# Altium PCB Layout.PcbDoc (part 2 of 2)
Units mm, origin at the board's own origin, x right, y up, seen from the top; angles counter-clockwise.
Board outline 72.5 x 55.5 mm, 4 copper layers (Top Layer, Ground Layer, Power Layer, Bottom Layer), stack 1.591 mm thick; 77 components, 40 nets, 247 pads, 203 vias.
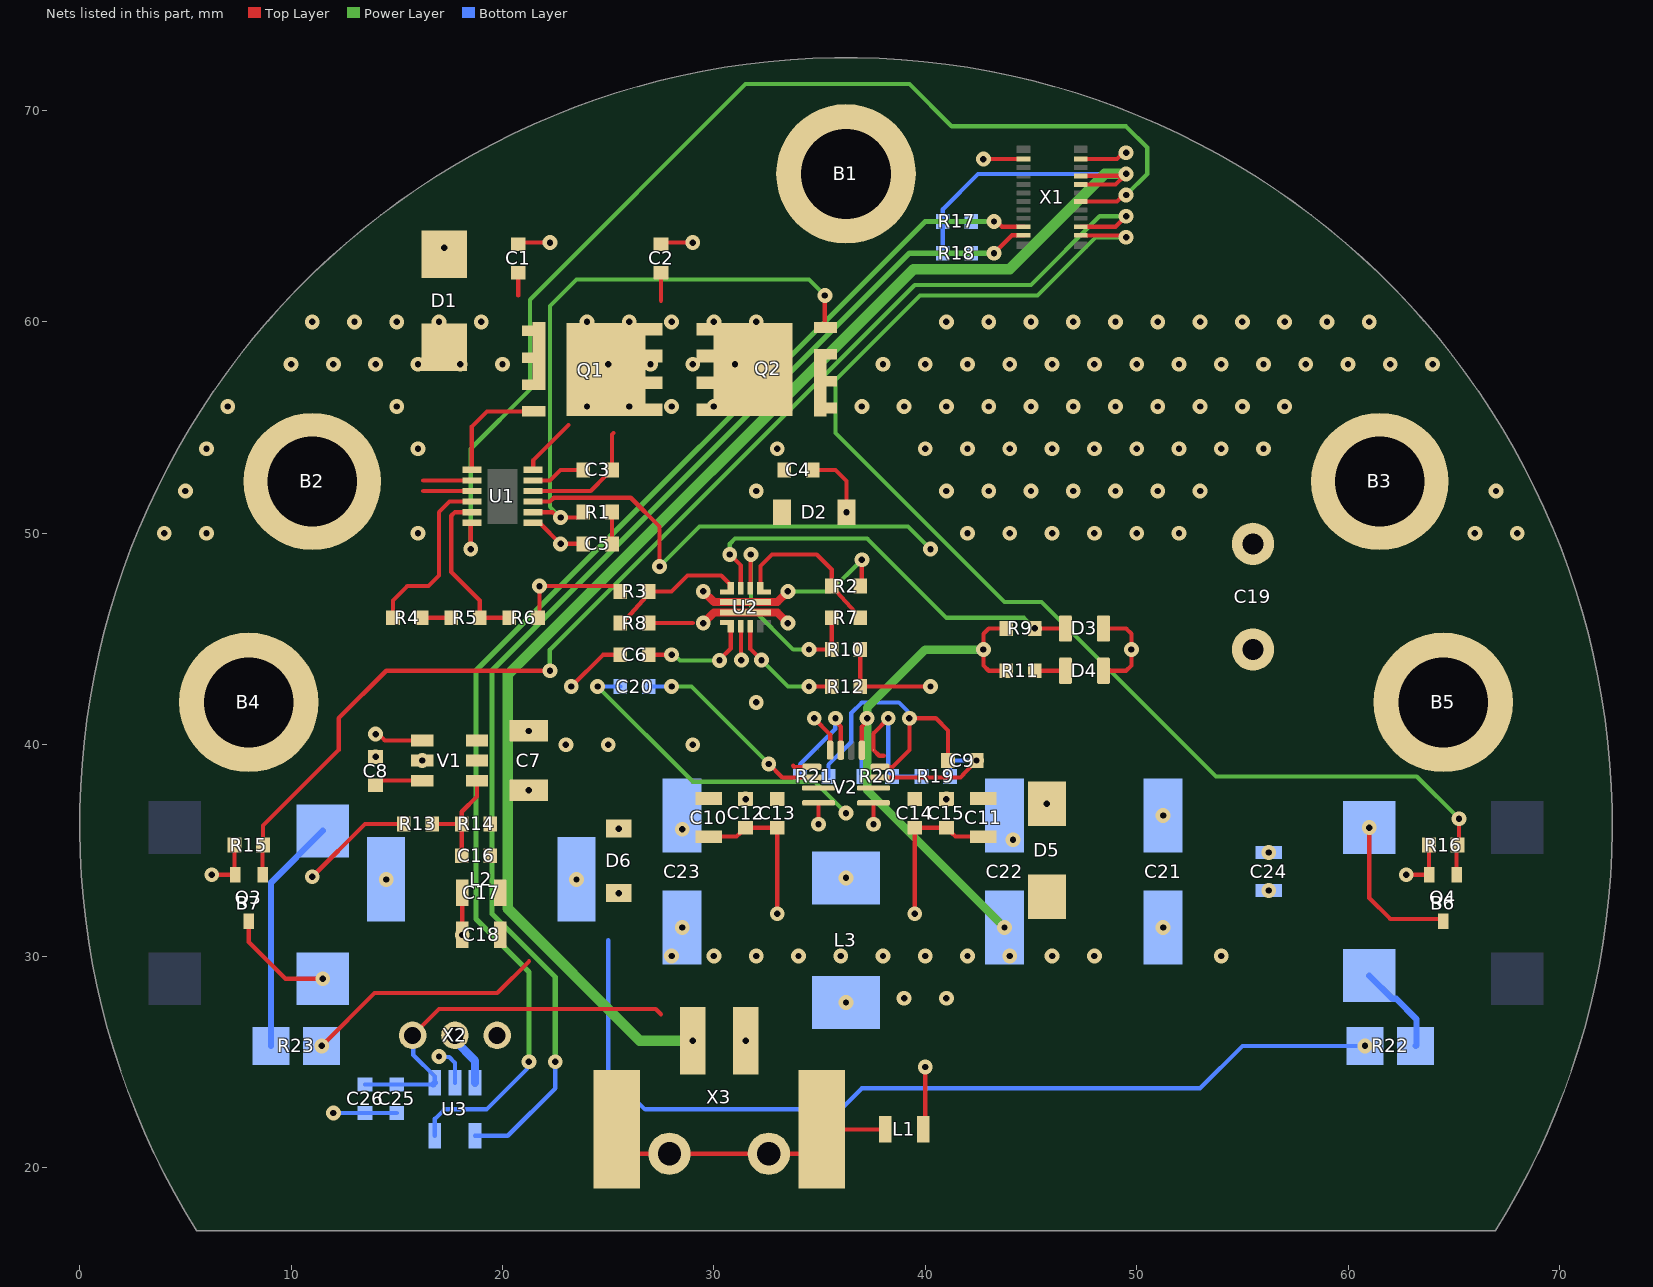
[diagram p4: the nets of this part, all layers, seen from the top]

## Part data
B1 B4 B5: library part "[Bolt] M4 len=4mm OD=6mm Spacer", "ID: 4mm / OD: 6mm", ComponentLink1Description="McMaster Supplier", ComponentLink1URL=https://www.mcmaster.com/94669A006/, System=Connector
B2 B3: library part "[Bolt] M4 16mm Button Head Hex Bolt", "92095A194", ComponentLink1Description="McMaster Link", ComponentLink1URL=https://www.mcmaster.com/92095A194/, System=Connector
B6 B7: library part "[Buzzer] Passive SMD 12V 80mA", "CT08E-16S400-2", Supplier Part Number 1=2603-CT08E-16S400-2CT-ND, Supplier 1=DigiKey
C1 C2 C3 C8 C12 C15 C20 C25: "CL10B104KB8NNNC", Capacitance=100nF, Max Voltage=50V, Size Package=0603, Supplier Part Number 1=1276-1000-6-ND, Tolerance=10%, Supplier 1=DigiKey
C4 C26: "GRM188C81C106MA73D", Capacitance=10uF, Max Voltage=16V, Size Package=0603, Supplier Part Number 1=490-7198-1-ND, Tolerance=20%, Supplier 1=DigiKey
C5: "C0603C103K5RACTU", Capacitance=10nF, Max Voltage=50V, Size Package=0603, Supplier Part Number 1=399-C0603C103K5RACTUDKR-ND, Tolerance=10%, Supplier 1=DigiKey
C6: "C0603C622J5GACTU", Capacitance=6200pF, Max Voltage=50V, Size Package=0603, Supplier Part Number 1=399-9977-6-ND, Tolerance=5%, Supplier 1=DigiKey
C7: "CGA5L3X5R1H106M160AB", Capacitance=10uF, Max Voltage=50V, Size Package=1206, Supplier Part Number 1=445-12883-6-ND, Tolerance=10%, Supplier 1=DigiKey
C9: "GRM188R61E225KA12D", Capacitance=2.2uF, Max Voltage=25V, Size Package=0603, Supplier Part Number 1=490-10731-1-ND, Tolerance=10%, Supplier 1=DigiKey
C10 C11 C17 C18 C24: "CL21A226MAYNNWE", Capacitance=22uF, Max Voltage=25V, Size Package=0805, Supplier Part Number 1=1276-CL21A226MAYNNWECT-ND, Tolerance=20%, Supplier 1=DigiKey
C13 C14: "GRM188R61E475KE11D", Capacitance=4.7uF, Max Voltage=25V, Size Package=0603, Supplier Part Number 1=490-7203-6-ND, Tolerance=10%, Supplier 1=DigiKey
C16: "C0603C120J5GACTU", Capacitance=12pF, Max Voltage=50V, Size Package=0603, Supplier Part Number 1=399-C0603C120J5GACTUCT-ND, Tolerance=5%, Supplier 1=DigiKey
C19: "35PK1000MEFC10X20", Capacitance=1000uF, Max Voltage=35V, Size Package=Thru-Hole, Supplier Part Number 1=1189-1742-ND, Tolerance=20%, Supplier 1=DigiKey
C21 C22 C23: "UWT1V470MCL1GS", Capacitance=47uF, Max Voltage=35V, Size Package=6.3mm, Supplier Part Number 1=493-2202-1-ND, Tolerance=20%, Supplier 1=DigiKey
D1: library part "[TVS] SMBJ33CA", "SMBJ33CA", Optimal Zener Voltage=33V, Supplier Part Number 1=SMBJ33CA-FDICT-ND, Supplier 1=DigiKey, Wattage=600W
D2: library part "[TVS] 17Vnom 27.6Vclamp_max", Optimal Zener Voltage=17V, Supplier Part Number 1=18-SZSMF4L17CAT3GCT-ND, Supplier 1=DigiKey, Wattage=400W
D3: "LG R971-KN-1-0-20-R18", Color=Green, Size Package=0805, Supplier Part Number 1=475-LGR971-KN-1CT-ND, Supplier 1=DigiKey
D4: "LY R976-PS-36-0-20-R18", Color=Yellow, Size Package=0805, Supplier Part Number 1=475-LYR976-PS-36-0-20-R18CT-ND, Supplier 1=DigiKey
D5: library part "[Zener] SMD 5.6V 1W 5%", "SMAZ5V6-13-F", Optimal Zener Voltage=5.6V, Supplier Part Number 1=SMAZ5V6-FDICT-ND, Tolerance=5%, Supplier 1=DigiKey, Wattage=1W
D6: library part "[Zener] SMD 12.75V 1W 5.88%", "KDZVTR12B", Optimal Zener Voltage=12.75V, Supplier Part Number 1=KDZVTR12BCT-ND, Tolerance=5.88%, Supplier 1=DigiKey, Wattage=1W
L1: library part "[Ferrite] SMD 0805 3A 30ohm", Res @ Freq="30 @ 100MHz", Size Package=0805, Supplier Part Number 1=MH2029-300YCT-ND, Supplier 1=DigiKey
L2: "SRU1038-100Y", DC Resistance=25mOhm, Inductance=10uH, Package="10 x 10mm", Supplier Part Number 1=SRU1038-100YCT-ND, Supplier 1=DigiKey
L3: "ECS-MPIL0630-2R2MC", Inductance=2.2uH, Package="7.4 x 6.6mm", Supplier Part Number 1=XC2402CT-ND, Supplier 1=DigiKey
Q1 Q2: "IAUCN04S7N005ATMA1", Supplier Part Number 1=448-IAUCN04S7N005ATMA1CT-ND, Supplier 1=DigiKey
Q3 Q4: "BSS816NWH6327XTSA1", Supplier Part Number 1=BSS816NWH6327XTSA1CT-ND, Supplier 1=DigiKey
R1: "RC0603FR-07100RL", Resistance=100, Size Package=0603, Supplier Part Number 1=311-100HRDKR-ND, Tolerance=1%, Supplier 1=DigiKey, Wattage=1/10W
R2: "CRGCQ0603F470K", Resistance=470k, Size Package=0603, Supplier Part Number 1=A129720DKR-ND, Tolerance=1%, Supplier 1=DigiKey, Wattage=1/10W
R3: "RK73H1JTTD1182F", Resistance=11.8k, Size Package=0603, Supplier Part Number 1=2019-RK73H1JTTD1182FDKR-ND, Tolerance=1%, Supplier 1=DigiKey, Wattage=1/10W
R4: "CR0603-FX-9092ELF", Resistance=90.9k, Size Package=0603, Supplier Part Number 1=CR0603-FX-9092ELFCT-ND, Tolerance=1%, Supplier 1=DigiKey, Wattage=1/10W
R5: "RMCF0603FT9K09", Resistance=9.09k, Size Package=0603, Supplier Part Number 1=RMCF0603FT9K09CT-ND, Tolerance=1%, Supplier 1=DigiKey, Wattage=1/10W
R6: "RMCF0603FT3K48", Resistance=3.48k, Size Package=0603, Supplier Part Number 1=RMCF0603FT3K48CT-ND, Tolerance=1%, Supplier 1=DigiKey, Wattage=1/10W
R7: "MCT06030C8201FP500", Resistance=8.2k, Size Package=0603, Supplier Part Number 1=MCT0603-8.20K-CFDKR-ND, Tolerance=1%, Supplier 1=DigiKey, Wattage=1/10W
R8 R9: "RC0603FR-07100KL", Resistance=100k, Size Package=0603, Supplier Part Number 1=311-100KHRDKR-ND, Tolerance=1%, Supplier 1=DigiKey, Wattage=1/10W
R10: "RMCF0603FT34K8", Resistance=34.8k, Size Package=0603, Supplier Part Number 1=RMCF0603FT34K8DKR-ND, Tolerance=1%, Supplier 1=DigiKey, Wattage=1/10W
R11: "RK73B1JTTD221J", Resistance=220, Size Package=0603, Supplier Part Number 1=2019-RK73B1JTTD221JDKR-ND, Tolerance=5%, Supplier 1=DigiKey, Wattage=1/8W
R12: "ERJ-3EKF5620V", Resistance=562, Size Package=0603, Supplier Part Number 1=P562HDKR-ND, Tolerance=1%, Supplier 1=DigiKey, Wattage=1/10W
R13: "RC0603FR-0730K1L", Resistance=30.1k, Size Package=0603, Supplier Part Number 1=311-30.1KHRCT-ND, Tolerance=1%, Supplier 1=DigiKey, Wattage=1/10W
R14: "ERJ-3EKF4223V", Resistance=422k, Size Package=0603, Supplier Part Number 1=P422KHDKR-ND, Tolerance=1%, Supplier 1=DigiKey, Wattage=1/10W
R15 R16: "RC0603FR-071ML", Resistance=1M, Size Package=0603, Supplier Part Number 1=311-1.00MHRDKR-ND, Tolerance=1%, Supplier 1=DigiKey, Wattage=1/10W
R17 R18 R21: "RMCF0603FT1K00", Resistance=1k, Size Package=0603, Supplier Part Number 1=RMCF0603FT1K00DKR-ND, Tolerance=1%, Supplier 1=DigiKey, Wattage=1/10W
R19: "RMCF0603FT10K0", Resistance=10k, Size Package=0603, Supplier Part Number 1=RMCF0603FT10K0DKR-ND, Tolerance=1%, Supplier 1=DigiKey, Wattage=1/10W
R20: "RC0603FR-0752K3L", Resistance=52.3k, Size Package=0603, Supplier Part Number 1=311-52.3KHRCT-ND, Tolerance=1%, Supplier 1=DigiKey, Wattage=1/10W
R22 R23: "HRG3216P-1000-D-T1", Resistance=100, Size Package=1206, Supplier Part Number 1=408-1865-1-ND, Tolerance=0.5%, Supplier 1=DigiKey, Wattage=1W
U1: "LM74810QDRRRQ1", Supplier Part Number 1=296-LM74810QDRRRQ1CT-ND, Supplier 1=DigiKey
U2: library part "[E-Fuse] 2.7-23V 5.5A", Supplier Part Number 1=296-TPS259460ARPWRDKR-ND, Supplier 1=DigiKey
U3: "MCP3221A0T-E/OT", Supplier Part Number 1=MCP3221A0T-E/OTCT-ND, Supplier 1=DigiKey
V1: library part "[Switching] SMD 0.8-31V 3A", "AP63301WU-7", Supplier Part Number 1=31-AP63301WU-7CT-ND, Supplier 1=DigiKey
V2: "MAX20408AFOF/VY+", Supplier Part Number 1=505-MAX20408AFOF/VY+-ND, Supplier 1=DigiKey
X1: "DF40C-20DP-0.4V(51)", Supplier Part Number 1=H11618CT-ND, Supplier 1=DigiKey, System=Connector
X2: "0353630360", Supplier Part Number 1=WM18932-ND, Supplier 1=DigiKey
X3: "1778764", Supplier Part Number 1=277-2315-1-ND, Supplier 1=DigiKey, System=Connector

## Via types
v1: diameter 0.7, hole 0.3, Top Layer to Bottom Layer, 203 vias

## Nets (pads, with @x,y where several pads share a name; then routed paths per layer and width w, separated by ;. In a path a pad name is that pad's centre, name@x,y a point inside that pad or via, vN(x,y) a via of type N, cw(c..) or ccw(c..) an arc to the next point about the centre after c; other vN are vias at no path point)
+5V: C21.1 C22.1 C23.1 C24.2 C25.2 C26.2 D5.1 L3.2 R9.2 R11.1 R17.2 R18.2 R20.2 U3.1 V2.13 X1.5 X1.7 X2.1 X3.1 | length 123.7
  Top Layer w0.2: X2.1@15.75,26.25 17,27.5 27.25,27.5 27.5,27.25 ; V2.13@37,39.736 37,40.852 37.25,41.102 v1@37.25,41.237 ; R11.1@43.825,43.5 43,43.5 42.75,43.75 v1(42.75,44.5) 42.75,45.25 43,45.5 R9.2@43.825,45.5 ; X1.7@47.355,66.5 49,66.5 49.415,66.915 47.37,66.915 X1.5@47.355,66.9
  Power Layer w0.4: v1(42.75,44.5) 40,44.5 37.255,41.755 37.255,41.255 v1(37.25,41.25) 37.25,37.85 v1(43.75,31.35)
  Power Layer w0.5: v1(29,26) 26.5,26 20.25,32.25 20.25,43.3 39.45,62.5 44,62.5 48.5,67 v1(49.5,67)
  Bottom Layer w0.2: C26.2@13.5,23.925 C25.2@15,23.925 U3.1@16.725,23.925 ; X2.1@15.75,26.25 15.78,26.22 15.78,25.32 16.8,24.3 U3.1@16.8,24 ; R20.2@37.075,38.5 37,38.575 37,39.75 37.25,40 v1(37.25,41.25) ; R18.2@40.825,63.25 R17.2@40.825,64.75 40.825,65.325 42.5,67 v1(49.5,67)
  Bottom Layer w0.3: U3.1@16.725,23.925 U3.1@16.8,24
  other v1: 36.25,27.8 39,28 41,28 28,30 30,30 32,30 34,30 36,30 38,30 40,30 42,30 44,30 46,30 48,30 54,30 28.5,31.35 51.25,31.35 56.25,33.1
"+5V Reg BIAS": C9.2 R21.1 V2.11 | length 13.6
  Top Layer w0.2: V2.11@37.862,38.95 38.45,38.95 39.25,39.75 v1(39.25,41.25) 40.5,41.25 41.075,40.675 C9.2@41.075,39.25
  Bottom Layer w0.2: R21.1@35.425,38.5 35.425,39.055 36.5,40.13 36.5,41.5 37,42 38.75,42 39.154,41.596 39.154,41.346 v1(39.25,41.25)
"+5V Reg FB": R19.2 R20.1 V2.12 | length 6.6
  Top Layer w0.2: V2.12@38.037,39.475 37.825,39.475 V2.12@37.55,39.75 37.55,40.537 v1@38.25,41.237
  Bottom Layer w0.2: v1(38.25,41.25) 38.25,38.675 R20.1@38.425,38.5 R19.2@39.825,38.5
"+5V Reg PGOOD": R21.2 V2.15 | length 5
  Top Layer w0.2: v1@35.75,41.237 35.75,41.102 36,40.852 V2.15@36,39.737
  Bottom Layer w0.2: R21.2@34.075,38.5 34.075,39.075 35.745,40.745 35.745,41.245 v1(35.75,41.25)
+12V: C16.2 C17.2 C18.2 D6.1 L2.2 R14.2 R22.2 R23.2 | length 55.5
  Top Layer w0.2: v1(11.45,25.75) 13.95,28.25 19.75,28.25 21.25,29.75
  Bottom Layer w0.2: 25,30.75 25,24.5 26.75,22.75 36,22.75 37,23.75 53,23.75 55,25.75 v1(60.8,25.75)
  other v1: 25.5,32.975 23.5,33.625
"+12V Reg BST": C8.2 V1.6 | length 2.3
  Top Layer w0.2: C8.2@14,38.075 14.225,38.3 V1.6@16.2,38.3
"+12V Reg FB": C16.1 R13.2 R14.1 V1.1 | length 5.3
  Top Layer w0.2: R13.2@16.675,36.25 R14.1@18.075,36.25 ; C16.1@18.075,34.75 R14.1@18.075,36.25 ; V1.1@18.8,38.3 18.8,37.55 18.075,36.825 R14.1@18.075,36.25
"+12V Reg SW": C8.1 L2.1 V1.5
  other v1: 14.5,33.625 16.2,39.25 14,39.425
"BATT Switched": B3.1 C19.1 Q2.1 U1.9 | length 22.6
  Top Layer w0.2: U1.9@21.45,51.5 22.25,51.5 22.43,51.68 26.07,51.68 27.432,50.318 v1(27.432,48.432)
  Power Layer w0.2: v1(27.432,48.432) 29.32,50.32 39.18,50.32 v1(40.25,49.25)
  other v1: 42,50 44,50 46,50 48,50 50,50 52,50 66,50 68,50 41,52 43,52 45,52 47,52 49,52 51,52 53,52 67,52 40,54 42,54 44,54 46,54 48,54 50,54 52,54 54,54 56,54 37,56 39,56 41,56 43,56 45,56 47,56 49,56 51,56 53,56 55,56 57,56 38,58 40,58 42,58 44,58 46,58 48,58 50,58 52,58 54,58 56,58 58,58 60,58 62,58 64,58 41,60 43,60 45,60 47,60 49,60 51,60 53,60 55,60 57,60 59,60 61,60
BATT_always_on: C2.2 C3.2 C4.2 D2.1 Q1.3 Q2.3 R2.2 U1.10 U1.12 U2.5 | length 19.9
  Top Layer w0.2: U1.10@21.45,52 24.175,52 24.925,52.75 24.95,52.75 25.175,52.975 C3.2@25.175,53 25.175,54.675 25.25,54.75 ; U1.12@21.45,53 21.45,53.45 23.125,55.125 ; 27.5,61 C2.2@27.5,62.325 ; R2.2@36.925,47.5 37,47.575 v1(37,48.75)
  Top Layer w0.38: v1(29.5,47.25) 30,46.75 U2.5@31.5,46.75 33,46.75 v1(33.5,47.25)
  Power Layer w0.2: v1(33.5,47.25) 35.5,47.25 v1(37,48.75)
  other v1: 32,52 33,54 24,56 26,56 28,56 30,56 25,58 27,58 29,58 31,58 24,60 26,60 28,60 30,60 32,60
BATT_MON: R4.1 R5.2 | length 1.4
  Top Layer w0.2: R4.1@16.175,46 R5.2@17.575,46
"BATTERY IN": B2.1 C1.2 D1.2 Q1.1 U1.2 U1.3 | length 5.7
  Top Layer w0.2: 16.25,52 U1.3@18.55,52 ; 16.25,52.5 U1.2@18.55,52.5 ; 20.75,61.25 C1.2@20.75,62.325
  other v1: 4,50 6,50 16,50 5,52 6,54 16,54 7,56 15,56 10,58 12,58 14,58 16,58 18,58 20,58 11,60 13,60 15,60 17,60 19,60
Buzzer_Ctrl_1: Q4.1 R16.2 X1.19 | length 60.9
  Top Layer w0.2: X1.19@47.355,64.1 47.37,64.085 49.415,64.085 v1(49.5,64) ; Q4.1@65.125,33.875 R16.2@65.125,35.25 ; R16.2@65.175,35.25 65.25,35.325 v1(65.25,36.5)
  Power Layer w0.2: v1(49.5,64) 48.057,64 45.307,61.25 39.75,61.25 35.75,57.25 35.75,54.75 43.75,46.75 45.5,46.75 53.75,38.5 63.25,38.5 v1(65.25,36.5)
Buzzer_Ctrl_2: Q3.1 R15.2 X1.17 | length 58.9
  Top Layer w0.2: Q3.1@8.65,33.85 8.65,35.225 R15.2@8.675,35.25 8.675,36.175 12.25,39.75 12.25,41.25 14.5,43.5 v1(22.25,43.5) ; X1.17@47.355,64.5 49,64.5 v1(49.5,65)
  Power Layer w0.2: v1(22.25,43.5) 22.241,43.509 22.241,44.491 39.5,61.75 45,61.75 48.25,65 v1(49.5,65)
CAP: C3.1 U1.11 | length 2.6
  Top Layer w0.2: U1.11@21.45,52.5 22.25,52.5 22.75,53 C3.1@23.825,53
Current_Sense_5V: U3.3 X2.2 | length 2.6
  Bottom Layer w0.4: X2.2@17.75,26.25 17.75,26 18.7,25.05 U3.3@18.7,24
DGATE: Q1.2 U1.1 | length 5.3
  Top Layer w0.2: U1.1@18.55,53 18.55,55.05 19.265,55.765 Q1.2@21.475,55.765
Earth: L1.1 X3.MP | length 14
  Top Layer w0.2: X3.MP@25.4,21.8 25.4,21.65 26.4,20.65 X3.MP@27.9,20.65 X3.MP@32.6,20.65 34.1,20.65 35.1,21.65 X3.MP@35.1,21.8 37.9,21.8 38.1,21.6 L1.1@38.1,21.5
EFuse_PGOOD: D3.1 R9.1 U2.3 | length 20.1
  Top Layer w0.2: v1(30.75,49) 31.275,48.475 U2.3@31.275,47.4 ; v1(45.175,45.5) 45.178,45.497 D3.1@46.63,45.497
  Power Layer w0.2: v1(30.75,49) 30.755,49.005 30.755,49.505 31,49.75 37.25,49.75 41,46 44.675,46 v1(45.175,45.5)
GND: B1.1 B4.1 B5.1 C1.1 C2.1 C4.1 C5.1 C6.1 C7.1 C9.1 C10.1 C11.1 C12.1 C13.1 C14.1 C15.1 C17.1 C18.1 C19.2 C21.2 C22.2 C23.2 C24.1 C25.1 C26.1 D1.1 D2.2 D3.2 D4.2 D5.2 D6.2 L1.2 Q3.2 Q4.2 R3.1 R6.2 R10.1 R12.1 R13.1 R15.1 R16.1 R19.1 U1.7 U2.8 U3.2 V1.4 V2.4 V2.5 V2.7 V2.8 V2.10 V2.16 X1.1 X1.2 X2.3 X3.2 | length 80.8
  Top Layer w0.2: v1(6.25,33.85) Q3.2@7.35,33.85 ; Q3.2@7.325,33.875 R15.1@7.325,35.25 R15.1@7.35,35.225 ; v1(11,33.75) 13.5,36.25 R13.1@15.325,36.25 ; v1(14,40.5) 14.135,40.5 14.435,40.2 V1.4@16.2,40.2 ; v1(18.1,31) C17.1@18.1,33 ; C1.1@20.75,63.675 20.825,63.75 v1(22.25,63.75) ; U1.7@21.45,50.5 21.75,50.5 v1(22.75,49.5) C5.1@23.825,49.5 ; R6.2@21.675,46 21.75,46.075 v1(21.75,47.5) 25.35,47.5 25.575,47.275 R3.1@25.575,47.25 ; v1(23.25,42.75) 24.75,44.25 C6.1@25.575,44.25 ; C2.1@27.5,63.675 27.575,63.75 v1(29,63.75) ; C10.1@29.75,35.65 31.075,35.65 31.25,35.825 31.25,35.85 31.475,36.075 C12.1@31.5,36.075 32.875,36.075 33,35.95 v1(33,32) ; v1@31.287,44.012 U2.8@31.287,45.587 ; C4.1@34.675,53 35.75,53 36.275,52.475 v1(36.275,51) ; v1@34.75,41.237 35.5,40.487 V2.16@35.5,39.737 ; v1(34.95,36.237) V2.4@34.951,37.25 ; R10.1@36.925,44.5 R12.1@36.925,42.75 v1(40.25,42.75) ; v1(37.55,36.237) V2.8@37.55,37.25 ; V2.10@37.862,38.45 41.663,38.45 41.838,38.625 41.838,38.638 42.425,39.225 v1(42.425,39.25) ; v1(39.5,32) 39.5,35.95 39.625,36.075 C15.1@41,36.075 41.025,36.075 41.25,35.85 41.25,35.825 41.425,35.65 C11.1@42.75,35.65 ; L1.2@39.9,21.8 40,21.9 v1(40,24.75) ; v1(42.75,67.7) X1.2@44.645,67.7 ; X1.1@47.355,67.7 49.065,67.7 49.365,68 v1(49.5,68) ; D4.2@48.43,43.497 49.497,43.497 49.75,43.75 v1(49.75,44.5) 49.75,45.25 49.503,45.497 D3.2@48.43,45.497 ; v1(62.75,33.85) Q4.2@63.85,33.85 ; Q4.2@63.825,33.875 R16.1@63.825,35.25
  Bottom Layer w0.2: v1(12,22.575) C26.1@13.5,22.575 C25.1@15,22.575 ; v1(17,25.25) 17.03,25.22 17.48,25.22 17.75,24.95 U3.2@17.75,24 ; R19.1@41.175,38.5 41.175,39.139 41.286,39.25 v1(42.425,39.25)
  other v1: 31.5,26 56.25,34.9 44.15,35.5 28.5,36 25.5,36.025 51.25,36.65 45.75,37.2 21.25,37.85 34.75,41.25 31.3,44 17.25,63.5
HGATE: Q2.2 R1.1 U1.8 | length 28.2
  Top Layer w0.2: U1.8@21.45,51 22.365,51 22.615,50.75 23.6,50.75 23.825,50.975 R1.1@23.825,51 ; v1(35.25,61.25) 35.25,59.76 Q2.2@35.275,59.735
  Power Layer w0.2: v1(22.75,50.75) 22.25,51.25 22.25,60.75 23.5,62 34.5,62 v1(35.25,61.25)
NetB6_1: B6.1 R22.1 | length 4.4
  Bottom Layer w0.3: B6.1@61,29.076 62.1,27.976 62.274,27.976 63.236,27.014 63.236,25.786 R22.1@63.2,25.75
NetB6_2: B6.2 Q4.3 | length 7.3
  Top Layer w0.2: v1(61,36.076) 61,32.75 62,31.75 64.4,31.75 Q4.3@64.5,31.65
NetB7_1: B7.1 R23.1 | length 11.2
  Bottom Layer w0.3: R23.1@9.05,25.75 9.05,33.474 B7.1@11.5,35.924
NetB7_2: B7.2 Q3.3 | length 5.2
  Top Layer w0.2: Q3.3@8,31.65 8,30.662 9.738,28.924 v1(11.5,28.924)
NetC5_2: C5.2 R1.2 | length 1.5
  Top Layer w0.2: C5.2@25.175,49.5 R1.2@25.175,51
NetC6_2: C6.2 U2.7 | length 5.4
  Top Layer w0.1: U2.7@30.475,45.775 U2.7@30.725,45.775
  Top Layer w0.2: C6.2@27.025,44.25 v1(28,44.25) ; v1@30.25,44 30.8,44.55 U2.7@30.8,45.6
  Power Layer w0.2: v1(28,44.25) 28.135,44.25 28.398,43.987 v1(30.262,43.987)
NetC20_1: C20.1 V2.2 | length 9.5
  Top Layer w0.2: v1(32.6,39.086) 33.236,38.45 V2.2@34.638,38.45
  Power Layer w0.2: v1(28,42.75) 28.936,42.75 v1(32.6,39.086)
  Bottom Layer w0.2: C20.1@26.925,42.75 v1(28,42.75)
NetC20_2: C20.2 L3.1 V2.6 | length 15.3
  Power Layer w0.2: v1(24.5,42.75) 29,38.25 34.763,38.25 v1(36.25,36.762)
  Bottom Layer w0.2: v1(24.5,42.75) C20.2@25.575,42.75
  other v1: 36.25,33.7
NetD4_1: D4.1 R11.2 | length 1.5
  Top Layer w0.2: R11.2@45.175,43.5 45.178,43.497 D4.1@46.63,43.497
NetR2_1: R2.1 R7.2 U2.1 | length 8
  Top Layer w0.1: U2.1@32.275,47.225 U2.1@32.525,47.225
  Top Layer w0.2: U2.1@32.2,47.4 32.2,48.45 32.75,49 34.865,49 35.575,48.29 R2.1@35.575,47.5 35.8,47.25 36.7,46.25 R7.2@36.925,46
NetR3_2: R3.2 R8.1 U2.4 | length 6.4
  Top Layer w0.1: U2.4@30.475,47.225 U2.4@30.725,47.225
  Top Layer w0.2: 25.9,46 26.8,47 27.025,47.25 28,47.25 28.75,48 30.35,48 30.75,47.6 30.75,47.45 U2.4@30.8,47.4
NetR7_1: R7.1 R10.2 U2.2 | length 10.3
  Top Layer w0.2: U2.2@31.725,47.4 31.738,47.412 31.738,48.988 v1(31.75,49) ; v1(34.5,44.5) R10.2@35.575,44.5 R7.1@35.575,46
  Power Layer w0.2: v1(31.75,49) 31.75,46.5 33.75,44.5 v1(34.5,44.5)
NetR12_2: R12.2 U2.9 | length 5.7
  Top Layer w0.2: U2.9@31.725,45.6 31.725,44.525 v1(32.25,44) ; v1(34.5,42.75) R12.2@35.575,42.75
  Power Layer w0.2: v1(32.25,44) 33.5,42.75 v1(34.5,42.75)
ORing_EN: U1.6 X1.11 | length 53.8
  Top Layer w0.2: v1(18.5,49.25) 18.5,50.45 U1.6@18.55,50.5 ; X1.11@47.355,65.7 49.065,65.7 49.365,66 v1(49.5,66)
  Power Layer w0.2: v1(18.5,49.25) 18.5,54 21.3,56.8 21.3,61.05 31.5,71.25 39.25,71.25 41.25,69.25 49.5,69.25 50.5,68.25 50.5,67 v1(49.5,66)
OV: R5.1 R6.1 U1.5 | length 7.8
  Top Layer w0.2: U1.5@18.55,51 17.75,51 17.579,50.829 17.579,48.171 18.925,46.825 R5.1@18.925,46 R6.1@20.325,46
SCL_5V: R17.1 U3.5 X1.18 | length 61.9
  Top Layer w0.2: v1(43.25,64.75) 43.385,64.75 43.635,64.5 X1.18@44.645,64.5
  Power Layer w0.25: v1(21.25,25) 21.25,29.25 18.75,31.75 18.75,43.5 40,64.75 v1(43.25,64.75)
  Bottom Layer w0.2: U3.5@16.8,21.5 16.8,22.3 17.25,22.75 19.25,22.75 21.154,24.654 21.154,24.904 v1(21.25,25) ; R17.1@42.175,64.75 v1(43.25,64.75)
SDA_5V: R18.1 U3.4 X1.20 | length 60.5
  Top Layer w0.2: v1(43.25,63.25) 44.1,64.1 X1.20@44.645,64.1
  Power Layer w0.25: v1(22.5,25) 22.5,29 19.5,32 19.5,43.5 39.25,63.25 v1(43.25,63.25)
  Bottom Layer w0.2: U3.4@18.7,21.5 20.25,21.5 22.5,23.75 v1(22.5,25) ; R18.1@42.175,63.25 v1(43.25,63.25)
SW: R4.2 U1.4 | length 8.2
  Top Layer w0.2: R4.2@14.825,46 14.825,46.825 15.5,47.5 16.5,47.5 17,48 17,51 17.5,51.5 U1.4@18.55,51.5
VREG_IN: C7.2 C10.2 C11.2 C12.2 C13.2 C14.2 C15.2 R8.2 U2.6 V1.2 V1.3 V2.1 V2.3 V2.9 | length 7.3
  Top Layer w0.2: R8.2@27.025,45.75 29,45.75 ; 33.75,39 33.8,38.95 V2.1@34.638,38.95
  Top Layer w0.38: v1(29.5,45.75) 30,46.25 U2.6@31.5,46.25 33,46.25 v1(33.5,45.75)
  other v1: 31.5,37.425 41,37.425 23,40 25,40 29,40 21.25,40.65 32,42
pads on no net: B6.MP B7.MP U1.13 U2.10 V2.14 V2.17 X1.3 X1.4 X1.6 X1.8 X1.9 X1.10 X1.12 X1.13 X1.14 X1.15 X1.16 X1.MP

## Polygon pours and split planes (outlines as drawn)
GND on Bottom Layer "GND Bottom Poly" (hatched 45Degree grid 0.6 track 0.2, remove dead copper, pour order 312): 0,17 0,72.5 72.5,72.5 72.5,17
VREG_IN on Bottom Layer "VREG_IN Bottom Poly" (solid, remove dead copper, pour order 299): 28.75,46.25 34,46.25 34,39.25 ccw(c35,39.25) 35,38.25 43.75,38.25 43.75,36.75 39.25,36.75 38.5,37.5 34,37.5 33.25,36.75 28,36.75 26,38.75 18,38.75 18,41.75 27.75,41.75 ccw(c27.75,42.75) 28.75,42.75
BATT_always_on on Bottom Layer "Batt Always On Bottom Poly" (solid, remove dead copper, pour order 303): 23.75,61.5 33,61.5 cw(c33,60.5) 34,60.5 34,46.75 28.75,46.75 28.75,53.5 ccw(c27.75,53.5) 27.75,54.5 23.75,54.5 cw(c23.75,55.5) 22.75,55.5 22.75,60.5 cw(c23.75,60.5)
"BATT Switched" on Bottom Layer "Batt Switched Bottom Poly" (solid, remove dead copper, pour order 306): 34.5,59.25 38.5,59.25 ccw(c38.5,60.25) 39.5,60.25 39.5,60.75 cw(c40.5,60.75) 40.5,61.75 70.75,61.75 70.75,48 41,48 cw(c41,49.5) 39.5,49.5 39.5,53 ccw(c38,53) 38,54.5 34.5,54.5
"+12V Reg SW" on Bottom Layer "+12V SW Bottom Poly" (solid, remove dead copper, pour order 301): 12.75,31.5 16.25,31.5 ccw(c16.25,32) 16.75,32 16.75,39.5 ccw(c16.25,39.5) 16.25,40 12.75,40 ccw(c12.75,39.5) 12.25,39.5 12.25,32 ccw(c12.75,32)
+12V on Bottom Layer "+12V Bottom Poly" (solid, remove dead copper, pour order 302): 19.5,37.25 23.75,37.25 cw(c23.75,36.75) 24.25,36.75 24.25,35.25 ccw(c24.75,35.25) 24.75,34.75 26,34.75 cw(c26.025,34.275) 26.5,34.3 26.5,30 cw(c26,30) 26,29.5 19.5,29.5 cw(c19.5,30) 19,30 19,36.75 cw(c19.5,36.75)
+5V on Bottom Layer "+5V " (solid, remove dead copper, pour order 304): 57.25,34 42.75,34 ccw(c42.75,33) 41.75,33 41.75,32 cw(c40.75,32) 40.75,31 31,31 cw(c31,32) 30,32 30,33 ccw(c29.5,33) 29.5,33.5 27.5,33.5 ccw(c27.5,33) 27,33 27,24.25 ccw(c27.5,24.25) 27.5,23.75 29.5,23.75 ccw(c29.5,24.25) 30,24.25 30,27.25 cw(c31,27.25) 31,28.25 32,28.25 cw(c32,27.25) 33,27.25 33,26.75 ccw(c34,26.75) 34,25.75 45,25.75 ccw(c45,26.75) 46,26.75 46,28.25 cw(c47,28.25) 47,29.25 57.25,29.25 ccw(c57.25,29.75) 57.75,29.75 57.75,33.5 ccw(c57.25,33.5)
"BATTERY IN" on Bottom Layer "Batt In Bottom Poly" (solid, remove dead copper, pour order 305): 22.25,61.5 22.25,56.5 16.5,56.5 16.5,49.5 cw(c14.945,49.555) 14.889,48 0.5,48 0.5,61.5
NetC20_2 on Bottom Layer "+5V Inductor Bottom Poly" (solid, remove dead copper, pour order 300): 37,35.25 38.25,35.25 38.25,32.25 34.25,32.25 34.25,35.25 35.5,35.25 35.95,35.8 35.95,37.725 36.55,37.725 36.55,35.8
GND on Top Layer "GND Top Poly" (hatched 45Degree grid 0.6 track 0.2, remove dead copper, pour order 313): 0,17 0,72.5 72.5,72.5 72.5,17
BATT_always_on on Top Layer "Batt Always On Top Poly" (solid, remove dead copper, pour order 293): 23.75,61.5 33,61.5 cw(c33,60.5) 34,60.5 34,46.75 28.75,46.75 28.75,53.5 ccw(c27.75,53.5) 27.75,54.5 23.75,54.5 cw(c23.75,55.5) 22.75,55.5 22.75,60.5 cw(c23.75,60.5)
VREG_IN on Top Layer "VREG_IN Top Poly" (solid, remove dead copper, pour order 290): 28.75,46.25 34,46.25 34,39.25 ccw(c35,39.25) 35,38.25 43.75,38.25 43.75,36.75 39.25,36.75 38.5,37.5 34,37.5 33.25,36.75 28,36.75 26,38.75 18,38.75 18,41.75 27.75,41.75 ccw(c27.75,42.75) 28.75,42.75
+12V on Top Layer "+12V Top Poly" (solid, remove dead copper, pour order 292): 19.5,37.25 23.75,37.25 cw(c23.75,36.75) 24.25,36.75 24.25,35.25 ccw(c24.75,35.25) 24.75,34.75 26,34.75 cw(c26.025,34.275) 26.5,34.3 26.5,30 cw(c26,30) 26,29.5 19.5,29.5 cw(c19.5,30) 19,30 19,36.75 cw(c19.5,36.75)
+5V on Top Layer "+5V Top Poly" (solid, remove dead copper, pour order 294): 57.25,34 42.75,34 ccw(c42.75,33) 41.75,33 41.75,32 cw(c40.75,32) 40.75,31 31,31 cw(c31,32) 30,32 30,33 ccw(c29.5,33) 29.5,33.5 27.5,33.5 ccw(c27.5,33) 27,33 27,24.25 ccw(c27.5,24.25) 27.5,23.75 29.5,23.75 ccw(c29.5,24.25) 30,24.25 30,27.25 cw(c31,27.25) 31,28.25 32,28.25 cw(c32,27.25) 33,27.25 33,26.75 ccw(c34,26.75) 34,25.75 45,25.75 ccw(c45,26.75) 46,26.75 46,28.25 cw(c47,28.25) 47,29.25 57.25,29.25 ccw(c57.25,29.75) 57.75,29.75 57.75,33.5 ccw(c57.25,33.5)
"BATTERY IN" on Top Layer "Batt In Top Poly" (solid, remove dead copper, pour order 295): 22.25,61.5 22.25,56.5 18,56.5 ccw(c18,55) 16.5,55 16.5,49.5 cw(c15,49.5) 15,48 0.5,48 0.5,61.5
"BATT Switched" on Top Layer "Batt Switched TopPoly" (solid, remove dead copper, pour order 296): 34.5,59.25 38.5,59.25 ccw(c38.5,60.25) 39.5,60.25 39.5,60.75 cw(c40.5,60.75) 40.5,61.75 70.75,61.75 70.75,48 41,48 cw(c41,49.5) 39.5,49.5 39.5,53 ccw(c38,53) 38,54.5 34.5,54.5
NetC20_2 on Top Layer "+5V Inductor Top Poly" (solid, remove dead copper, pour order 291): 37,35.25 38.25,35.25 38.25,32.25 34.25,32.25 34.25,35.25 35.5,35.25 35.95,35.8 35.95,37.725 36.55,37.725 36.55,35.8
"+12V Reg SW" on Power Layer "+12V SW Power Poly" (solid, remove dead copper, pour order 298): 12.75,31.5 16.25,31.5 ccw(c16.25,32) 16.75,32 16.75,39.5 ccw(c16.25,39.5) 16.25,40 12.75,40 ccw(c12.75,39.5) 12.25,39.5 12.25,32 ccw(c12.75,32)
GND on Ground Layer "GND Power Poly" (solid, remove dead copper, pour order 297): 0,17 0,72.5 72.5,72.5 72.5,17
BATT_always_on on Bottom Solder "Batt Always On Bottom Solder Poly" (solid, pour order 311): 23.75,61.5 33,61.5 cw(c33,60.5) 34,60.5 34,46.75 28.75,46.75 28.75,53.5 ccw(c27.75,53.5) 27.75,54.5 23.75,54.5 cw(c23.75,55.5) 22.75,55.5 22.75,60.5 cw(c23.75,60.5)
"BATTERY IN" on Bottom Solder "Batt In Bottom Solder Poly" (solid, pour order 309): 22.25,61.5 22.25,56.5 16.5,56.5 16.5,49.5 cw(c15,49.5) 15,48 0.5,48 0.5,61.5
"BATT Switched" on Bottom Solder "Batt Switched Bottom Solder Poly" (solid, pour order 310): 34.5,59.25 38.5,59.25 ccw(c38.5,60.25) 39.5,60.25 39.5,60.75 cw(c40.5,60.75) 40.5,61.75 70.75,61.75 70.75,48 41,48 cw(c41,49.5) 39.5,49.5 39.5,53 ccw(c38,53) 38,54.5 34.5,54.5

## Keep-outs
Keep-Out Layer:
  the board outline again, w0.2

## Silkscreen, mask and mechanical layers (free items; w line width, h text height)
Top Overlay:
  region: 63.749,23.466 63.057,23.466 63.057,22.761 60.943,22.761 60.943,23.466 60.238,23.466 60.238,22.057 60.943,22.057 60.943,20.647 60.238,20.647 60.238,22.057 58.829,22.057 58.829,21.353 58.83,21.353 58.83,21.352 59.534,21.352 59.534,20.647 58.83,20.647 58.829,20.647 58.829,19.943 58.125,19.943 58.125,18.534 58.829,18.534 58.829,19.238 59.533,19.238 59.533,19.239 59.534,19.239 59.534,19.943 60.238,19.943 60.238,19.239 60.239,19.239 60.239,19.238 60.943,19.238 60.943,19.943 63.057,19.943 63.057,19.238 63.76,19.238 63.76,19.239 63.761,19.239 63.761,19.943 64.466,19.943 64.466,19.239 64.467,19.239 64.467,19.238 65.17,19.238 65.17,18.534 65.875,18.534 65.875,19.943 65.17,19.943 65.17,20.647 65.169,20.647 64.466,20.647 64.466,21.352 65.169,21.352 65.169,21.353 65.17,21.353 65.17,22.057 63.761,22.057 63.761,20.647 63.057,20.647 63.057,22.057 63.761,22.057 63.761,23.466 63.75,23.466
  region: 60.943,19.182 60.943,18.534 61.648,18.534 61.648,19.237 61.647,19.237 61.647,19.238 60.943,19.238 60.943,19.183
  region: 58.829,22.274 58.829,22.76 58.828,22.76 58.828,22.761 58.125,22.761 58.125,22.057 58.829,22.057 58.829,22.273
  region: 65.875,22.564 65.875,22.761 65.171,22.761 65.171,22.76 65.17,22.76 65.17,22.057 65.875,22.057 65.875,22.563
  region: 62.793,18.534 63.057,18.534 63.057,19.238 62.353,19.238 62.353,19.237 62.352,19.237 62.352,18.534 62.792,18.534
  lines w0.1: 12.5,28.5 12.5,28.5
  lines w0.3: 47.375,18.25 50.625,18.25 50.625,20.75 47.375,20.75 47.375,18.25
  text "GND" at 34.917,71 h1
  text "GND" at 6.667,46 h1
  text "GND" at 63.167,46 h1
  text "PGOOD" at 49.23,44.997 h1
  text "+5V" at 49.23,42.997 h1
  text "S" at 17.417,27.5 h1
  text "+" at 15.417,27.333 h1
  text "-" at 19.417,27 h1
  text "+5V" at 24.75,26.25 h1
  text "GND" at 33,26.25 h1
  text "ORing Board" at 42.604,22.1 h1.2
  text "V2" at 48,18.9 h1.2
Bottom Overlay:
  region: 61.206,18.534 60.943,18.534 60.943,19.238 61.647,19.238 61.647,19.237 61.648,19.237 61.648,18.534 61.207,18.534
  region: 58.125,22.564 58.125,22.761 58.828,22.761 58.828,22.76 58.829,22.76 58.829,22.057 58.125,22.057 58.125,22.563
  region: 65.17,22.274 65.17,22.76 65.171,22.76 65.171,22.761 65.875,22.761 65.875,22.057 65.17,22.057 65.17,22.273
  region: 63.057,19.182 63.057,18.534 62.352,18.534 62.352,19.237 62.353,19.237 62.353,19.238 63.057,19.238 63.057,19.183
  region: 60.251,23.466 60.943,23.466 60.943,22.761 63.057,22.761 63.057,23.466 63.761,23.466 63.761,22.057 63.057,22.057 63.057,20.647 63.761,20.647 63.761,22.057 65.17,22.057 65.17,21.353 65.169,21.353 65.169,21.352 64.466,21.352 64.466,20.647 65.169,20.647 65.17,20.647 65.17,19.943 65.875,19.943 65.875,18.534 65.17,18.534 65.17,19.238 64.467,19.238 64.467,19.239 64.466,19.239 64.466,19.943 63.761,19.943 63.761,19.239 63.76,19.239 63.76,19.238 63.057,19.238 63.057,19.943 60.943,19.943 60.943,19.238 60.239,19.238 60.239,19.239 60.238,19.239 60.238,19.943 59.534,19.943 59.534,19.239 59.533,19.239 59.533,19.238 58.829,19.238 58.829,18.534 58.125,18.534 58.125,19.943 58.829,19.943 58.829,20.647 58.83,20.647 59.534,20.647 59.534,21.352 58.83,21.352 58.83,21.353 58.829,21.353 58.829,22.057 60.238,22.057 60.238,20.647 60.943,20.647 60.943,22.057 60.238,22.057 60.238,23.466 60.25,23.466
  lines w0.3: 39.875,19.25 43.125,19.25 43.125,21.75 39.875,21.75 39.875,19.25
  text "GND" at 37.583,71 h1
  text "BATT OUT" at 58.832,62 h1
  text "BATT IN" at 20.749,61.75 h1
  text "GND" at 9.333,46 h1
  text "GND" at 65.833,46 h1
  text "ORing Board" at 56.896,20.1 h1.2
  text "V2" at 42.5,19.9 h1.2
  text "+" at 16.083,17.75 h1
  text "S" at 18.083,17.75 h1
  text "-" at 20.083,17.75 h1
  text "+5V" at 29.35,17.75 h1
  text "GND" at 33.816,17.75 h1
Poly Planning:
  lines w0.1: 12.25,32 ccw(c12.75,32) 12.75,31.5 ; 12.25,39.5 cw(c12.75,39.5) 12.75,40 ; 15,48 ccw(c15,49.5) 16.5,49.5 ; 16.25,31.5 ccw(c16.25,32) 16.75,32 ; 16.25,40 cw(c16.25,39.5) 16.75,39.5 ; 16.5,55 cw(c18,55) 18,56.5 ; 19,30 ccw(c19.5,30) 19.5,29.5 ; 19,36.75 cw(c19.5,36.75) 19.5,37.25 ; 22.75,55.5 ccw(c23.75,55.5) 23.75,54.5 ; 22.75,60.5 cw(c23.75,60.5) 23.75,61.5 ; 23.75,37.25 cw(c23.75,36.75) 24.25,36.75 ; 24.25,35.25 ccw(c24.75,35.25) 24.75,34.75 ; 26,29.5 ccw(c26,30) 26.5,30 ; 26,34.75 cw(c26,34.25) 26.5,34.25 ; 27,24.25 ccw(c27.5,24.25) 27.5,23.75 ; 27,33 cw(c27.5,33) 27.5,33.5 ; 27.75,41.75 ccw(c27.75,42.75) 28.75,42.75 ; 27.75,54.5 cw(c27.75,53.5) 28.75,53.5 ; 28.75,45.5 cw(c29.75,45.5) 29.75,46.5 cw(c29.75,47.5) 28.75,47.5 ; 29.5,23.75 ccw(c29.5,24.25) 30,24.25 ; 29.5,33.5 cw(c29.5,33) 30,33 ; 30,27.25 cw(c31,27.25) 31,28.25 ; 30,32 ccw(c31,32) 31,31 ; 32,28.25 cw(c32,27.25) 33,27.25 ; 33,26.75 ccw(c34,26.75) 34,25.75 ; 33,61.5 cw(c33,60.5) 34,60.5 ; 34,39.25 ccw(c35,39.25) 35,38.25 ; 34,47.5 cw(c33,47.5) 33,46.5 cw(c33,45.5) 34,45.5 34,38.25 43.75,38.25 43.75,36.75 39.25,36.75 38.5,37.5 34,37.5 33.25,36.75 28.75,36.75 28,36.75 26,38.75 23.5,38.75 18,38.75 18,41.75 24.75,41.75 28.75,41.75 28.75,46.5 ; 34,61.25 34,61.5 ; 38,54.5 cw(c38,53) 39.5,53 ; 38.5,59.25 ccw(c38.5,60.25) 39.5,60.25 ; 39.5,49.5 ccw(c41,49.5) 41,48 ; 39.5,60.75 cw(c40.5,60.75) 40.5,61.75 ; 40.75,31 ccw(c40.75,32) 41.75,32 ; 41.75,33 cw(c42.75,33) 42.75,34 ; 45,25.75 ccw(c45,26.75) 46,26.75 ; 46,28.25 cw(c47,28.25) 47,29.25 ; 57.25,29.25 ccw(c57.25,29.75) 57.75,29.75 ; 57.25,34 cw(c57.25,33.5) 57.75,33.5 ; 12.25,40 12.25,31.5 16.75,31.5 16.75,40 12.25,40 ; 12.25,40 12.25,40 ; 27,33.5 30,33.5 30,31 31.5,31 33,31 41.75,31 41.75,34 57.75,34 57.75,29.25 46,29.25 46,25.75 33,25.75 33,28.25 30,28.25 30,23.75 27,23.75 27,29.25 27,33.5 ; 27,33.5 27,33.5 ; 28.75,46.5 28.75,54.5 22.75,54.5 22.75,61.5 34,61.5 ; 28.75,46.5 34,46.5 34,61.5 ; 0.5,48 0.5,61.5 22.25,61.5 22.25,56.5 16.5,56.5 16.5,48 0.5,48 ; 19,29.5 26.5,29.5 26.5,34.75 24.25,34.75 24.25,37.25 23,37.25 19,37.25 19,29.5 ; 34.25,32.25 34.25,35.25 35.5,35.25 35.95,35.8 35.95,37.725 36.55,37.725 36.55,35.8 37,35.25 38.25,35.25 38.25,32.25 34.25,32.25 ; 34.5,54.5 39.5,54.5 39.5,48 70.75,48 70.75,61.75 39.5,61.75 39.5,59.25 38,59.25 34.5,59.25 34.5,54.5

## Text inside footprints (layer, text, board x,y; h text height)
C19: Bottom Overlay "+" at 56.1,51.718 h1.2 r90